# Altium PCB Sound_Sensor_PoE_v1.0.PcbDoc (part 1 of 4)
Units mil, origin at the board's own origin, x right, y up, seen from the top; angles counter-clockwise.
Board outline 3543.31 x 3543.31 mil, 2 copper layers (Top Layer, Bottom Layer), stack 57 mil thick; 149 components, 113 nets, 536 pads, 184 vias.
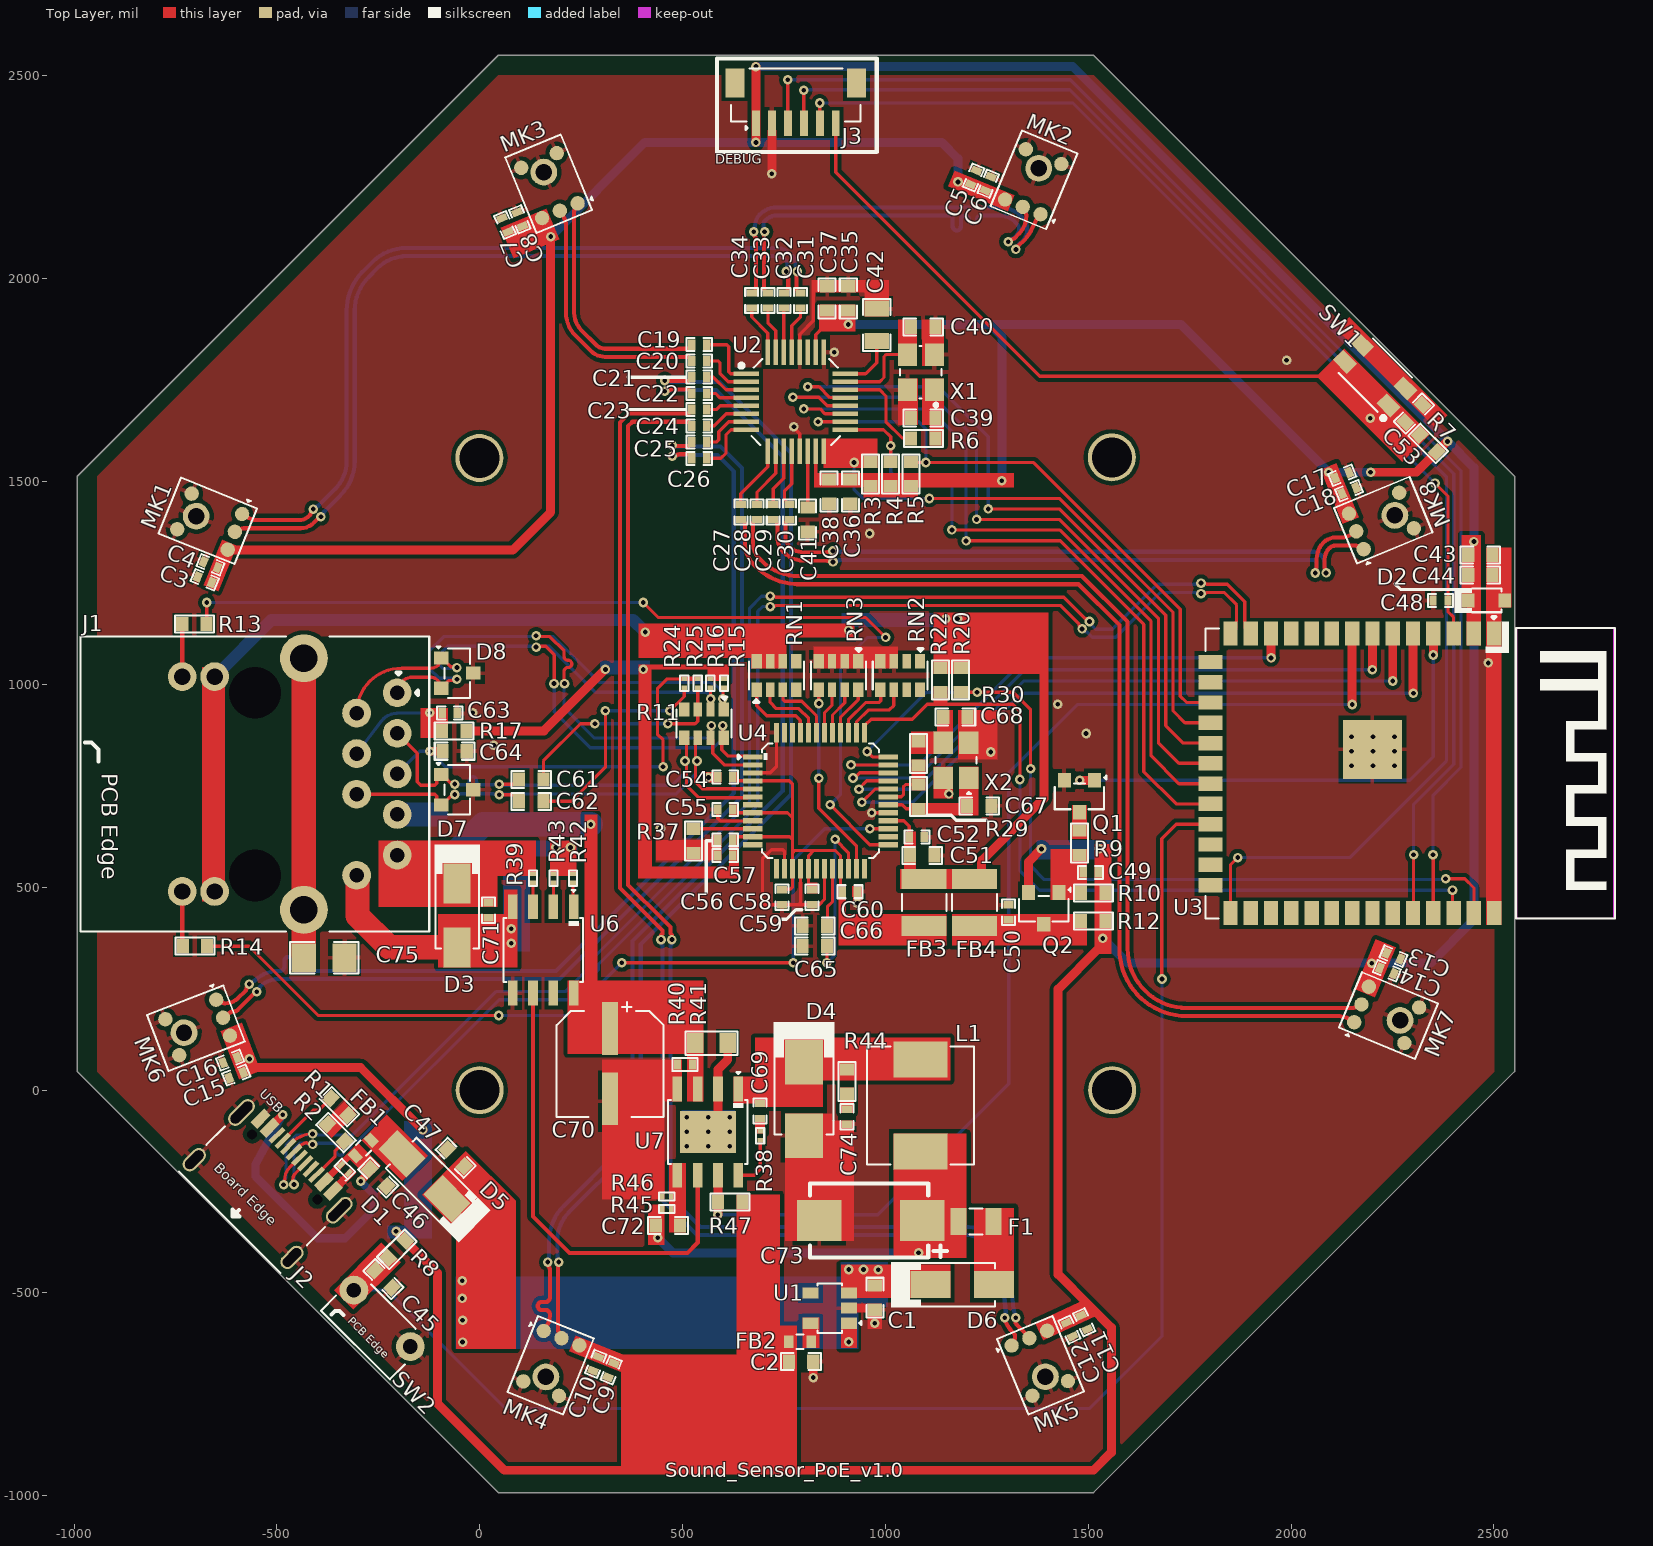
[diagram p0: Top Layer view]
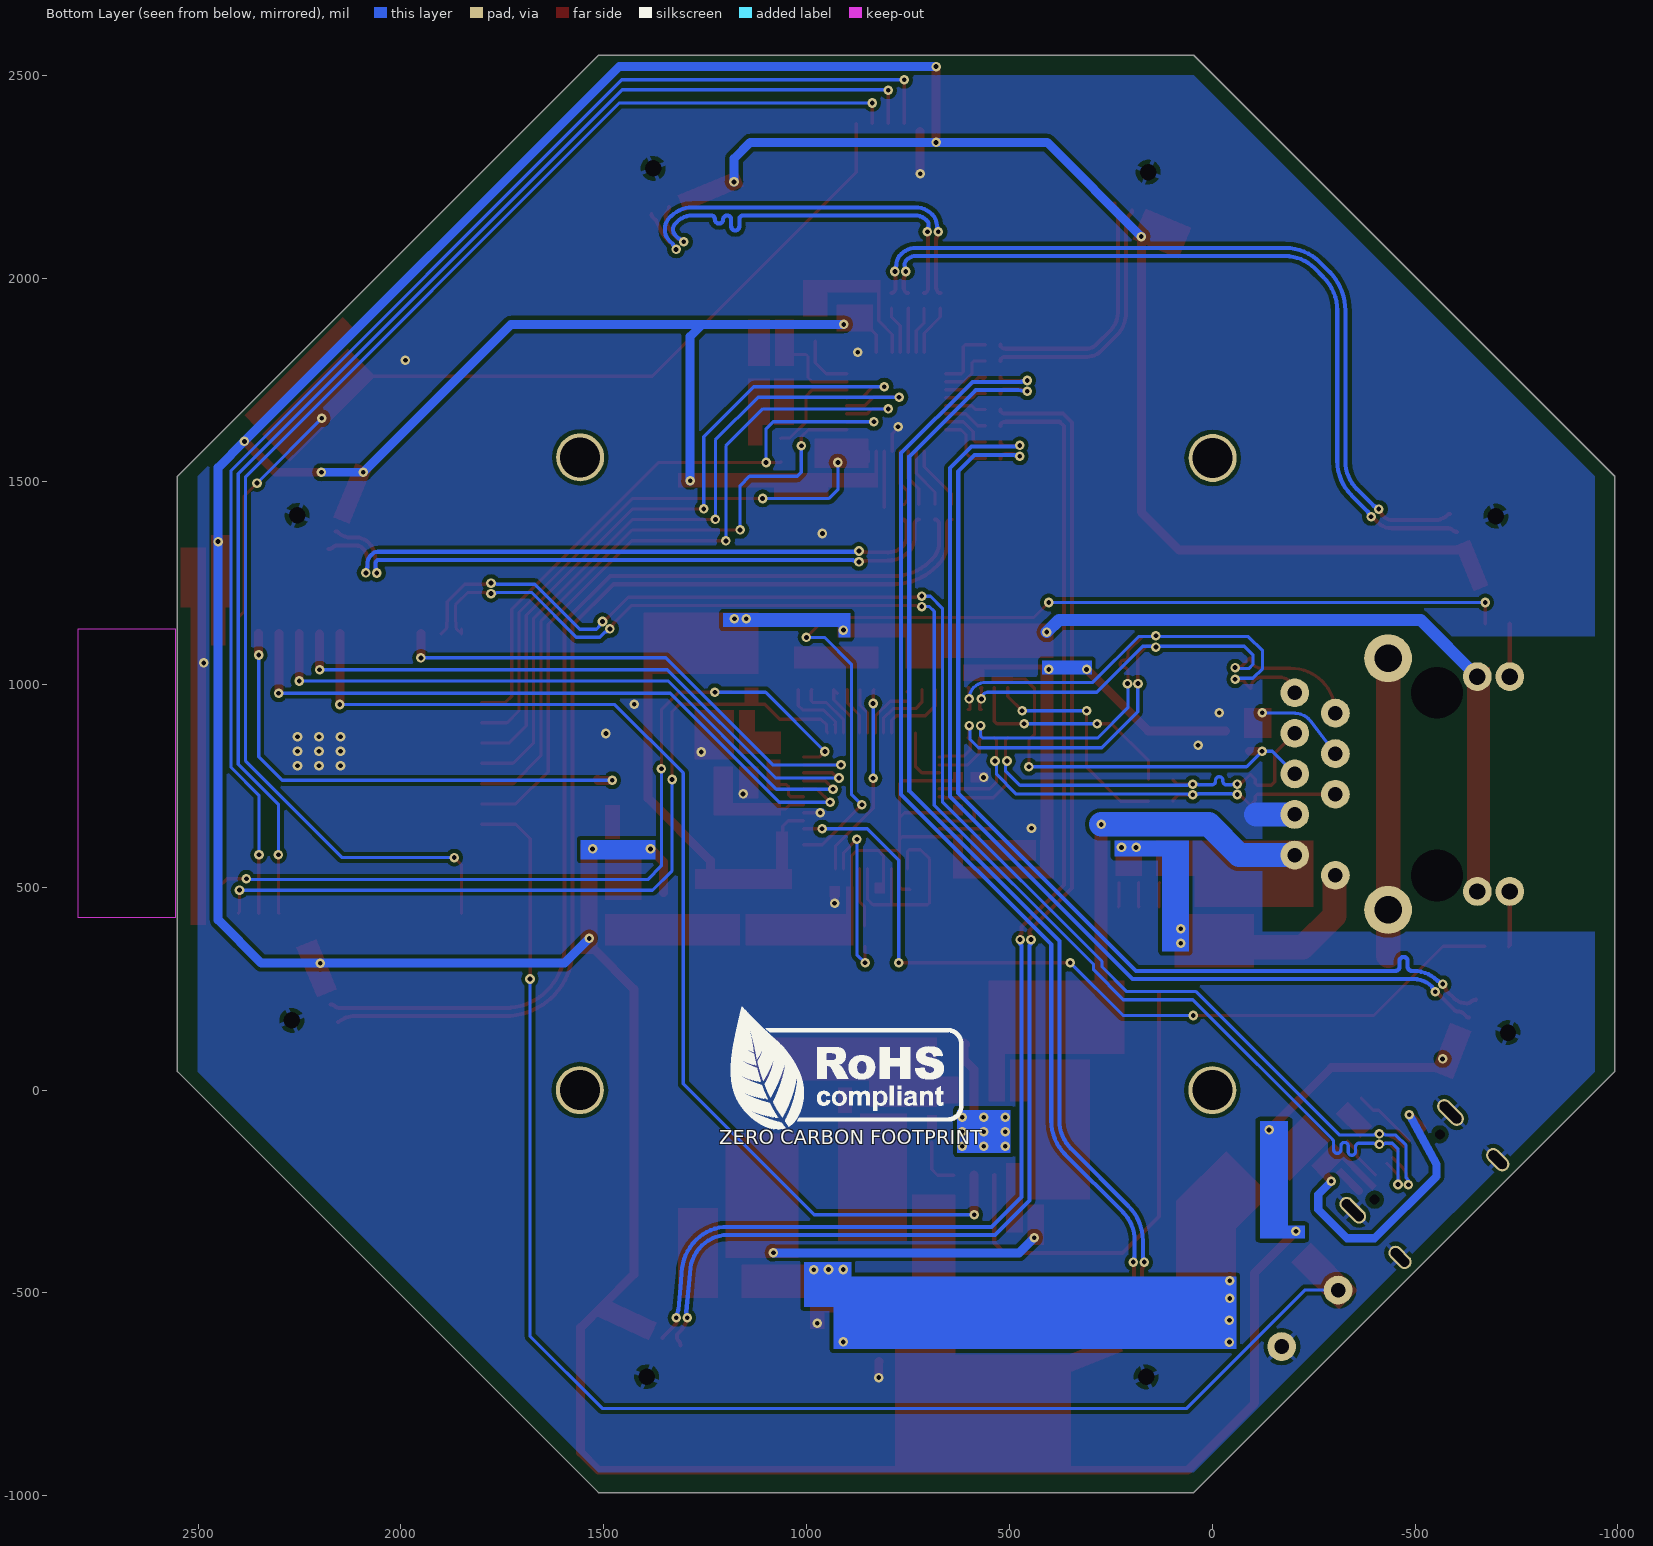
[diagram p1: Bottom Layer view, seen from below]
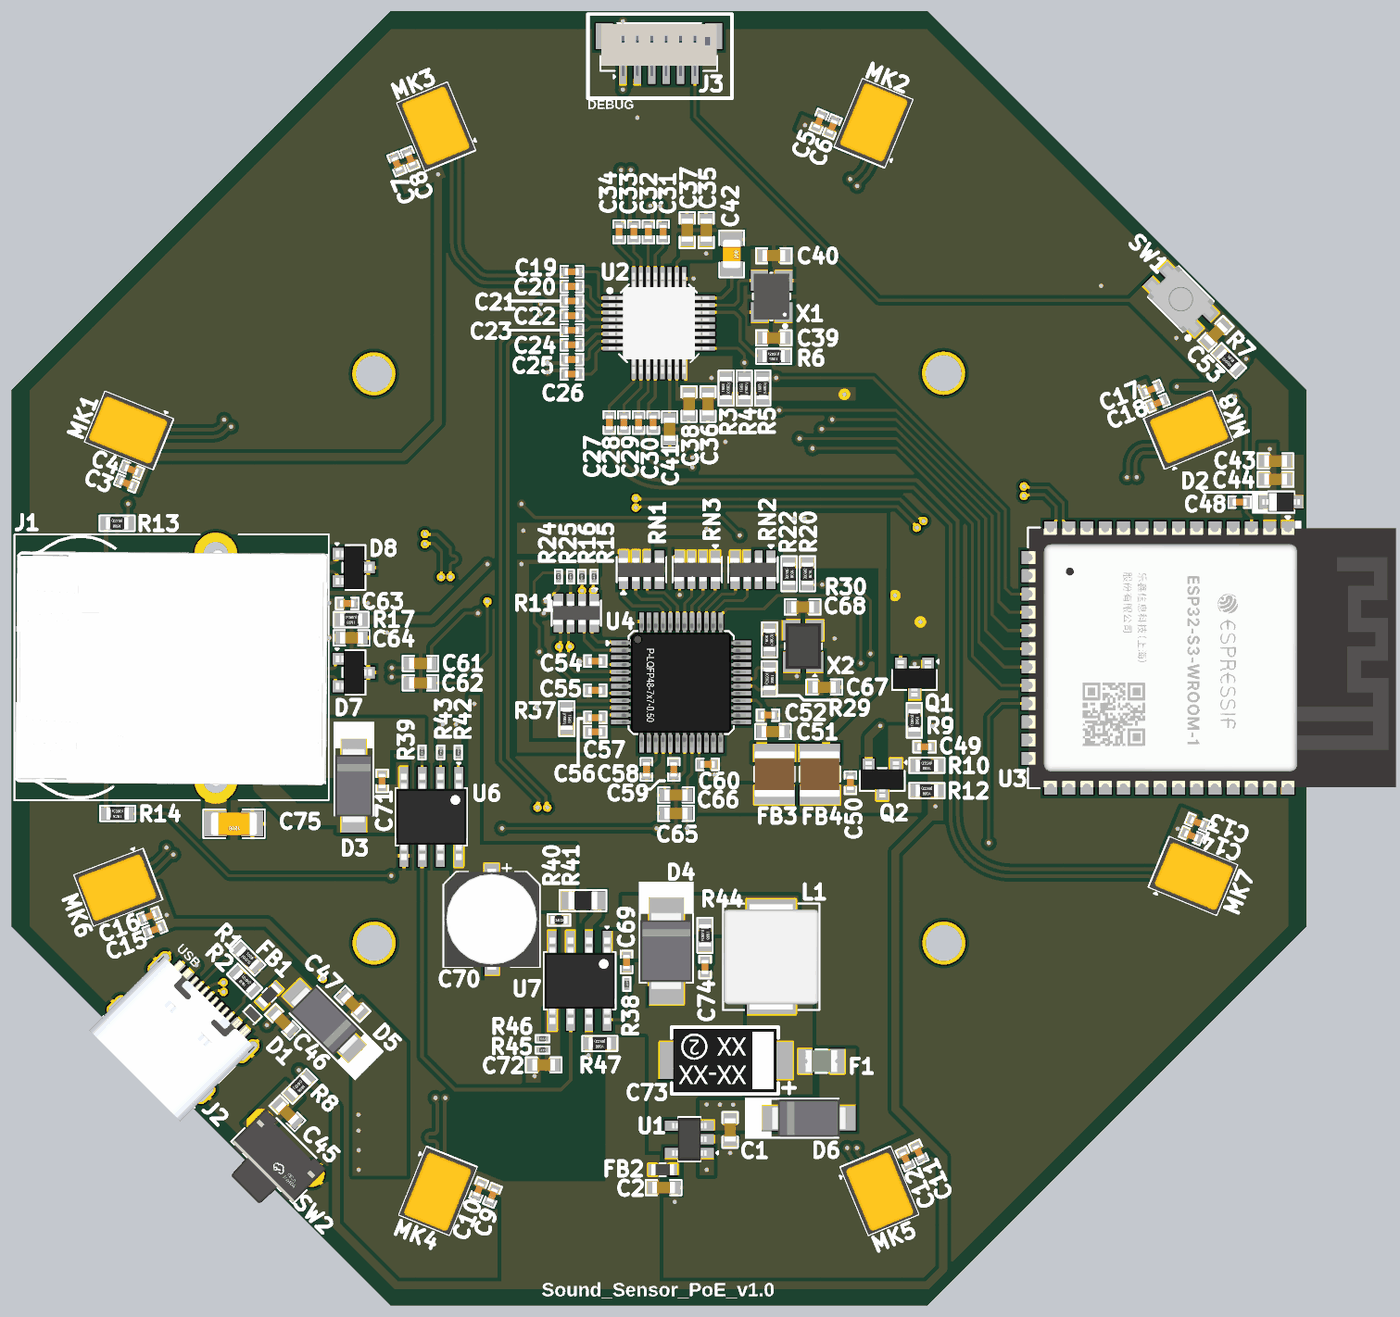
[diagram p3: 3D render of the assembled board from above, using the file's embedded part models]

## Layer stack, top to bottom
Top Solder: solder mask 3, Solder Resist, Dk 3.5
Top Layer: signal copper 10
Dielectric 1: dielectric 37, FR-4, Dk 4.8
Bottom Layer: signal copper 10
Bottom Solder: solder mask 3, Solder Resist, Dk 3.5

## Board outline
-992.17,45.64 45.64,-992.17 1513.33,-992.17 2551.14,45.64 2551.14,1513.33 1513.33,2551.14 45.64,2551.14 -992.17,1513.33

## Design rules (kind name [scope] priority, off if disabled: settings)
Clearance Clearance_top [OnLayer('Top Layer')] p1: gap=10 ignorepadtopadclearanceinfootprint=FALSE except(5: SMDPad-THPad SMDPad-Hole; 7: Arc-SMDPad Track-SMDPad SMDPad-SMDPad)
Clearance Clearance_Bottom [OnLayer('Bottom Layer')] p2: gap=10 ignorepadtopadclearanceinfootprint=FALSE except(5: SMDPad-THPad SMDPad-Hole; 7: Arc-SMDPad Track-SMDPad SMDPad-SMDPad)
ComponentClearance [All] p1: gap=0 collisioncheckmode=3 verticalgap=0 showdistances=FALSE
DiffPairsRouting DiffPairsRouting_10 [InDifferentialPairClass('USB_Lines')] p1: maxlimit=12 minlimit=10 mostfreqgap=12 toplayer_minwidth=8 toplayer_maxwidth=8 toplayer_prefwidth=8 bottomlayer_minwidth=8 bottomlayer_maxwidth=8 bottomlayer_prefwidth=8 impedanceprofiledriven=TRUE impedanceprofileid={CC3068ED-7670-4747-8044-4FC642AA30B4} impedanceprofilevalue=90.000000 maxuncoupledlength=500
DiffPairsRouting DiffPairsRouting_2 [InDifferentialPairClass('OUT8_Lines')] p2: maxlimit=10 minlimit=10 mostfreqgap=10 toplayer_minwidth=10 toplayer_maxwidth=10 toplayer_prefwidth=10 bottomlayer_minwidth=10 bottomlayer_maxwidth=10 bottomlayer_prefwidth=10 impedanceprofiledriven=TRUE impedanceprofileid={4D369393-52E4-4E5C-B60A-CF207B47102A} impedanceprofilevalue=80.000000 maxuncoupledlength=500
DiffPairsRouting DiffPairsRouting_9 [InDifferentialPairClass('OUT7_Lines')] p3: maxlimit=10 minlimit=10 mostfreqgap=10 toplayer_minwidth=10 toplayer_maxwidth=10 toplayer_prefwidth=10 bottomlayer_minwidth=10 bottomlayer_maxwidth=10 bottomlayer_prefwidth=10 impedanceprofiledriven=TRUE impedanceprofileid={4D369393-52E4-4E5C-B60A-CF207B47102A} impedanceprofilevalue=80.000000 maxuncoupledlength=500
DiffPairsRouting DiffPairsRouting_8 [InDifferentialPairClass('OUT6_Lines')] p4: maxlimit=10 minlimit=10 mostfreqgap=10 toplayer_minwidth=10 toplayer_maxwidth=10 toplayer_prefwidth=10 bottomlayer_minwidth=10 bottomlayer_maxwidth=10 bottomlayer_prefwidth=10 impedanceprofiledriven=TRUE impedanceprofileid={4D369393-52E4-4E5C-B60A-CF207B47102A} impedanceprofilevalue=80.000000 maxuncoupledlength=500
DiffPairsRouting DiffPairsRouting_7 [InDifferentialPairClass('OUT5_Lines')] p5: maxlimit=10 minlimit=10 mostfreqgap=10 toplayer_minwidth=10 toplayer_maxwidth=10 toplayer_prefwidth=10 bottomlayer_minwidth=10 bottomlayer_maxwidth=10 bottomlayer_prefwidth=10 impedanceprofiledriven=TRUE impedanceprofileid={4D369393-52E4-4E5C-B60A-CF207B47102A} impedanceprofilevalue=80.000000 maxuncoupledlength=500
DiffPairsRouting DiffPairsRouting_6 [InDifferentialPairClass('OUT4_Lines')] p6: maxlimit=10 minlimit=10 mostfreqgap=10 toplayer_minwidth=10 toplayer_maxwidth=10 toplayer_prefwidth=10 bottomlayer_minwidth=10 bottomlayer_maxwidth=10 bottomlayer_prefwidth=10 impedanceprofiledriven=TRUE impedanceprofileid={4D369393-52E4-4E5C-B60A-CF207B47102A} impedanceprofilevalue=80.000000 maxuncoupledlength=500
DiffPairsRouting DiffPairsRouting_5 [InDifferentialPairClass('OUT3_Lines')] p7: maxlimit=10 minlimit=10 mostfreqgap=10 toplayer_minwidth=10 toplayer_maxwidth=10 toplayer_prefwidth=10 bottomlayer_minwidth=10 bottomlayer_maxwidth=10 bottomlayer_prefwidth=10 impedanceprofiledriven=TRUE impedanceprofileid={4D369393-52E4-4E5C-B60A-CF207B47102A} impedanceprofilevalue=80.000000 maxuncoupledlength=500
DiffPairsRouting DiffPairsRouting_4 [InDifferentialPairClass('OUT2_Lines')] p8: maxlimit=10 minlimit=10 mostfreqgap=10 toplayer_minwidth=10 toplayer_maxwidth=10 toplayer_prefwidth=10 bottomlayer_minwidth=10 bottomlayer_maxwidth=10 bottomlayer_prefwidth=10 impedanceprofiledriven=TRUE impedanceprofileid={4D369393-52E4-4E5C-B60A-CF207B47102A} impedanceprofilevalue=80.000000 maxuncoupledlength=500
DiffPairsRouting DiffPairsRouting_3 [InDifferentialPairClass('OUT1_Lines')] p9: maxlimit=10 minlimit=10 mostfreqgap=10 toplayer_minwidth=10 toplayer_maxwidth=10 toplayer_prefwidth=10 bottomlayer_minwidth=10 bottomlayer_maxwidth=10 bottomlayer_prefwidth=10 impedanceprofiledriven=TRUE impedanceprofileid={4D369393-52E4-4E5C-B60A-CF207B47102A} impedanceprofilevalue=80.000000 maxuncoupledlength=500
DiffPairsRouting DiffPairsRouting_1 [InDifferentialPairClass('Ethernet_Lines')] p10: maxlimit=16 minlimit=10 mostfreqgap=16 toplayer_minwidth=8 toplayer_maxwidth=8 toplayer_prefwidth=8 bottomlayer_minwidth=8 bottomlayer_maxwidth=8 bottomlayer_prefwidth=8 impedanceprofiledriven=TRUE impedanceprofileid={FC305CDD-E4C1-4513-972F-A62FC3777315} impedanceprofilevalue=100.000000 maxuncoupledlength=551
DiffPairsRouting [InDifferentialPairClass('EtherCAT_A_Lines')] p11: maxlimit=16 minlimit=16 mostfreqgap=16 toplayer_minwidth=8 toplayer_maxwidth=8 toplayer_prefwidth=8 bottomlayer_minwidth=8 bottomlayer_maxwidth=8 bottomlayer_prefwidth=8 impedanceprofiledriven=TRUE impedanceprofileid={FC305CDD-E4C1-4513-972F-A62FC3777315} impedanceprofilevalue=100.000000 maxuncoupledlength=500
HoleSize [All] p1: absolutevalues=TRUE maxlimit=500 minlimit=1 maxpercent=80.000 minpercent=20.000
MatchedLengths "Schematic Matched Net Lengths_4" [InDifferentialPairClass('EtherCAT_A_Lines')] p1: tolerance=20 checknetsindiffpair=TRUE checkdiffpairvsdiffpair=FALSE checkxsignals=FALSE checkothers=FALSE
MatchedLengths "Schematic Matched Net Lengths_3" [InDifferentialPairClass('EtherCAT_A_Lines')] p2: tolerance=20 checknetsindiffpair=TRUE checkdiffpairvsdiffpair=FALSE checkxsignals=FALSE checkothers=FALSE
MatchedLengths "Schematic Matched Net Lengths_2" [InNetClass('USB')] p3: tolerance=20 checknetsindiffpair=TRUE checkdiffpairvsdiffpair=FALSE checkxsignals=FALSE checkothers=FALSE
MatchedLengths "Schematic Matched Net Lengths_1" [InNetClass('Ethernet')] p4: tolerance=20 checknetsindiffpair=TRUE checkdiffpairvsdiffpair=FALSE checkxsignals=FALSE checkothers=FALSE
MatchedLengths "Schematic Matched Net Lengths" [InNetClass('OUT1')] p5: tolerance=20 checknetsindiffpair=TRUE checkdiffpairvsdiffpair=FALSE checkxsignals=FALSE checkothers=FALSE
MaxMinImpedance "Schematic Impedance Constraint_3" [InNetClass('Ethernet')] p1: minimum=97.00 maximum=105.0
MaxMinImpedance "Schematic Impedance Constraint_1" [InNetClass('EtherCAT_A')] p2: minimum=85.00 maximum=95.00
MaxMinImpedance "Schematic Impedance Constraint_2" [InNetClass('USB')] p3: minimum=85.00 maximum=95.00
MaxMinImpedance "Schematic Impedance Constraint" [InNetClass('OUT1')] p4: minimum=85.00 maximum=95.00
MinimumSolderMaskSliver [All] p1: minsoldermaskwidth=0
PolygonConnect [All] p1: thpad.connectstyle=Relief thpad.reliefconductorwidth=10 thpad.reliefentries=4 thpad.polygonreliefangle="90 Angle" thpad.airgapwidth=10 smdpad.connectstyle=Relief smdpad.reliefconductorwidth=10 smdpad.reliefentries=4 smdpad.polygonreliefangle="90 Angle" smdpad.airgapwidth=10 via.connectstyle=Direct via.reliefconductorwidth=10 via.reliefentries=4 via.polygonreliefangle="90 Angle" via.airgapwidth=10
RoutingVias [All] p1: holewidth=11.81 width=23.62 viastyle="Through Hole" minholewidth=11.81 minwidth=23.62 maxholewidth=11.81 maxwidth=23.62
SilkToSilkClearance [All] p1: silktosilkclearance=0
SilkToSolderMaskClearance [IsPad] p1: minsilkscreentomaskgap=0 clearancetoexposedcopper=TRUE
SolderMaskExpansion [All] p1: expansion=4 istentingtop=FALSE
Width [All] p1: maxlimit=100 minlimit=8 preferedwidth=22 toplayer_maxwidth=60 minimp=50.000000 maximp=50.000000 favimp=50.000000
24 further rules are at their usual default settings.

## Classes and differential pairs
differential pair class Ethernet_Lines: RD TD
differential pair class EtherCAT_A_Lines: RD TD
net class Ethernet: RD_P TD_N TD_P
net class EtherCAT_A: RD_N RD_P TD_N TD_P
component class U_Ethernet_POE: C49 C50 C51 C52 C54 C55 C56 C57 C58 C59 C60 C61 C62 C63 C64 C65 C66 C67 C68 C69 C70 C71 C72 C73 C74 C75 D3 D4 D6 D7 D8 F1 FB3 FB4 J1 L1 Q1 Q2 R9 R10 R11 R12 R13 R14 R15 R16 R17 R20 R22 R24 R25 R29 R30 R37 R38 R39 R40 R41 R42 R43 R44 R45 R46 R47 RN1 RN2 RN3 S U4 U6 U7 X2
differential pair class USB_Lines: USB.USB
net class USB: USB.USB_N USB.USB_P
differential pair class OUT8_Lines: MIC_OUTS.OUT8
differential pair class OUT7_Lines: MIC_OUTS.OUT7
differential pair class OUT6_Lines: MIC_OUTS.OUT6
differential pair class OUT5_Lines: MIC_OUTS.OUT5
differential pair class OUT4_Lines: MIC_OUTS.OUT4
differential pair class OUT3_Lines: MIC_OUTS.OUT3
differential pair class OUT2_Lines: MIC_OUTS.OUT2
differential pair class OUT1_Lines: MIC_OUTS.OUT1
net class OUT8: MIC_OUTS.OUT8_N MIC_OUTS.OUT8_P
net class OUT7: MIC_OUTS.OUT7_N MIC_OUTS.OUT7_P
net class OUT6: MIC_OUTS.OUT6_N MIC_OUTS.OUT6_P
net class OUT5: MIC_OUTS.OUT5_N MIC_OUTS.OUT5_P
net class OUT4: MIC_OUTS.OUT4_N MIC_OUTS.OUT4_P
net class OUT3: MIC_OUTS.OUT3_N MIC_OUTS.OUT3_P
net class OUT2: MIC_OUTS.OUT2_N MIC_OUTS.OUT2_P
net class OUT1: MIC_OUTS.OUT1_N MIC_OUTS.OUT1_P
component class U_Sensor_Sheet: C3 C4 C5 C6 C7 C8 C9 C10 C11 C12 C13 C14 C15 C16 C17 C18 MK1 MK2 MK3 MK4 MK5 MK6 MK7 MK8
component class U_Power_Section: C1 C2 FB2 U1
component class U_Controller_Sheet: C43 C44 C45 C48 C53 D2 R7 R8 SW1 SW2 U3
component class U_Connector_Sheet: C46 C47 D1 D5 FB1 J2 J3 R1 R2
component class U_ADC_Section: 3 C19 C20 C21 C22 C23 C24 C25 C26 C27 C28 C29 C30 C31 C32 C33 C34 C35 C36 C37 C38 C39 c40 C41 C42 R3 R4 R5 R6 U2 X1
differential pair TD: +TD_P -TD_N
differential pair RD: +RD_P -RD_N
differential pair USB.USB: +USB.USB_P -USB.USB_N
differential pair MIC_OUTS.OUT8: +MIC_OUTS.OUT8_P -MIC_OUTS.OUT8_N
differential pair MIC_OUTS.OUT7: +MIC_OUTS.OUT7_P -MIC_OUTS.OUT7_N
differential pair MIC_OUTS.OUT6: +MIC_OUTS.OUT6_P -MIC_OUTS.OUT6_N
differential pair MIC_OUTS.OUT5: +MIC_OUTS.OUT5_P -MIC_OUTS.OUT5_N
differential pair MIC_OUTS.OUT4: +MIC_OUTS.OUT4_P -MIC_OUTS.OUT4_N
differential pair MIC_OUTS.OUT3: +MIC_OUTS.OUT3_P -MIC_OUTS.OUT3_N
differential pair MIC_OUTS.OUT2: +MIC_OUTS.OUT2_P -MIC_OUTS.OUT2_N
differential pair MIC_OUTS.OUT1: +MIC_OUTS.OUT1_P -MIC_OUTS.OUT1_N

## Components (designator, comment, footprint, x,y, rotation, side; value= is the part's Value field where it differs from the comment)
C1 "1uF" Cap-0603 974.06,-511.51 r270 top locked
C2 "4.7uF" Cap-0603 792.06,-669.39 r0 top locked
C3 "1uF" Cap-0402 -677.67,1258.42 r158 top locked
C4 "220pF" "Cap 0402" -663.51,1295.49 r158 top locked
C5 "1uF" Cap-0402 1217.34,2249.59 r67.5 top locked
C6 "220pF" "Cap 0402" 1253.49,2234.49 r67.5 top locked
C7 "1uF" Cap-0402 62.41,2132.58 r112.5 top locked
C8 "220pF" "Cap 0402" 98.71,2146.52 r112.5 top locked
C9 "1uF" Cap-0402 323.81,-690.46 r248 top
C10 "220pF" "Cap 0402" 286.35,-674.64 r248 top
C11 "1uF" Cap-0402 1489.87,-572.39 r295 top
C12 "220pF" "Cap 0402" 1453.87,-590.39 r295 top
C13 "1uF" Cap-0402 2252.49,330.49 r337.5 top
C14 "220pF" "Cap 0402" 2236.25,294 r337.5 top
C15 "1uF" Cap-0402 -600,37 r201 top
C16 "220pF" "Cap 0402" -615.07,74.11 r201 top
C17 "1uF" Cap-0402 2126.01,1515.49 r22.5 top locked
C18 "220pF" "Cap 0402" 2143.1,1477.77 r22.5 top locked
C19 "100nF" Cap-0402 541.09,1837.49 r0 top locked
C20 "100nF" Cap-0402 541.09,1797.49 r0 top locked
C21 "100nF" Cap-0402 541.09,1757.49 r0 top locked
C22 "100nF" Cap-0402 541.09,1717.49 r0 top locked
C23 "100nF" Cap-0402 541.09,1677.49 r0 top locked
C24 "100nF" Cap-0402 541.09,1637.49 r0 top locked
C25 "100nF" Cap-0402 541.09,1597.49 r0 top locked
C26 "100nF" Cap-0402 541.09,1557.49 r0 top locked
C27 "100nF" Cap-0402 643.59,1424.99 r90 top locked
C28 "100nF" Cap-0402 683.59,1424.99 r90 top locked
C29 "100nF" Cap-0402 723.59,1424.99 r90 top locked
C30 "100nF" Cap-0402 763.59,1424.99 r90 top locked
C31 "100nF" Cap-0402 790.59,1946.49 r270 top locked
C32 "100nF" Cap-0402 750.59,1946.49 r270 top locked
C33 "100nF" Cap-0402 710.59,1946.49 r270 top locked
C34 "100nF" Cap-0402 670.59,1946.49 r270 top locked
C35 "1uF" Cap-0603 908.59,1951.49 r90 top locked
C36 "1uF" Cap-0603 913.59,1475.49 r270 top
C37 "100nF" Cap-0603 856.59,1951.49 r90 top
C38 "100nF" Cap-0603 861.59,1475.49 r270 top
C39 "20pF" Cap-0603 1093.59,1656.49 r0 top locked
C40 "20pF" Cap-0603 1093.59,1881.49 r180 top locked
C41 "100nF" Cap-0603 808.59,1406.49 r270 top locked
C42 "220nF" Cap-0805 978.59,1886.49 r270 top locked
C43 "1uF" Cap-0603 2466.6,1319.56 r0 top
C44 "100nF" Cap-0603 2466.6,1269.56 r0 top
C45 "100nF" Cap-0603 -237.3,-465.73 r135 top locked
C46 "1uF" Cap-0603 -250.26,-215.36 r315 top
C47 "1uF" Cap-0603 -59.23,-166.74 r135 top
C48 "1uF" Cap-0402 2368.42,1206.99 r0 top
C49 "22nF" Cap-0402 1506,537 r0 top
C50 "22nF" Cap-0402 1303.49,438.49 r270 top
C51 "10uF" Cap-0603 1091.11,578.86 r180 top
C52 "0.1uf" Cap-0402 1077.61,623.9 r180 top locked
C53 "100nF" Cap-0603 2303,1667.98 r45 top locked
C54 "0.1uf" Cap-0402 605.19,771.68 r0 top
C55 "0.1uf" Cap-0402 605.19,691.64 r0 top
C56 "0.1uf" Cap-0402 605.19,617.15 r0 top locked
C57 "0.1uf" Cap-0402 605.19,578.15 r0 top locked
C58 "0.1uf" Cap-0402 745.27,475.34 r90 top
C59 "0.1uf" Cap-0402 819.63,475.34 r90 top
C60 "0.1uf" Cap-0402 912.5,489 r180 top
C61 "6.8nF" Cap-0603 127,765.5 r0 top
C62 "6.8nF" Cap-0603 127,711.96 r0 top
C63 "22nF" Cap-0402 -73.83,929.49 r180 top
C64 "10nF" Cap-0603 -61.77,835.38 r180 top
C65 "10nF" Cap-0603 826,355 r0 top
C66 "4.7uF" Cap-0603 826,405 r0 top
C67 "12pF" Cap-0603 1231.49,700.49 r180 top locked
C68 "12pF" Cap-0603 1172.57,919.71 r180 top locked
C69 "0.1uf" Cap-0402 690.69,-51.6 r270 top locked
C70 "15uF" VMMC0571J150MV 321.49,65.1 r270 top
C71 "0.1uf" Cap-0402 22,443.5 r90 top
C72 "12pF" Cap-0603 463.99,-333.8 r180 top locked
C73 "470uF" Case-E 1090.49,-321.51 r180 top locked
C74 "220pF" "Cap 0402" 905.52,-65.51 r90 top
C75 "1000pF" Cap-1206 -383.26,326.49 r180 top
D1 "TPD1E10B06DPYR" X1SON -332.42,-194.48 r135 top
D2 "UDD32C03L01" SOD-323 2481.6,1206.99 r0 top
D3 "SMAJ58A" SMA -55.51,430.75 r270 top locked
D4 "SS510B" SMB_ 799.52,-22.08 r90 top locked
D5 "SS36" SMA -136.12,-212.34 r135 top
D6 "SS36" SMA 1189.49,-479.51 r0 top locked
D7 "SP0502BAHTG" SOT-23 -55.51,740.49 r270 top
D8 "SP0502BAHTG" SOT-23 -55.51,1027.92 r270 top locked
F1 "BSMD0805L-200" Fuse-0805 1223.79,-323.51 r0 top
FB1 "BLM18SG121TN1D" "IND-0603 (1608 Metric)" -287.06,-142.7 r45 top locked
FB2 "BLM18SG121TN1D" "IND-0603 (1608 Metric)" 789.62,-620.51 r180 top locked
FB3 "FBMH3225HM601NT" IND-1210 1219.49,462.57 r90 top
FB4 "FBMH3225HM601NT" IND-1210 1095.61,462.57 r270 top
J1 "HR873170C" HR873170C -553.34,979.49 r90 top locked
J2 "TYPE-C-31-M-12" TYPE-C-31-M-12_ -539.96,-70.6 r315 top locked
J3 "Voltlink Target" "Voltlink Target" 779.28,2432.7 r0 top locked
L1 "33uH" MDA7050_330M 1086.44,-37.59 r270 top locked
MK1 "SPM0687LR5H-1" SPM0687LR5H-1 -665.59,1401.32 r248 top locked
MK2 "SPM0687LR5H-1" SPM0687LR5H-1 1364.42,2239.08 r157.5 top locked
MK3 "SPM0687LR5H-1" SPM0687LR5H-1 171.94,2229.68 r202.5 top locked
MK4 "SPM0687LR5H-1" SPM0687LR5H-1 176.65,-673.59 r338 top locked
MK5 "SPM0687LR5H-1" SPM0687LR5H-1 1380.66,-673.32 r22.5 top locked
MK6 "SPM0687LR5H-1" SPM0687LR5H-1 -695.15,154.53 r291 top locked
MK7 "SPM0687LR5H-1" SPM0687LR5H-1 2235.6,185.55 r67.5 top locked
MK8 "SPM0687LR5H-1" SPM0687LR5H-1 2222.73,1403.02 r112.5 top locked
Q1 "LMUN2211LT1G" SOT-23 1478.5,724.36 r180 top
Q2 "AO3407" SOT-23 1390.49,447.99 r180 top
R1 "5.1K" Res-0603 -345.85,-40.75 r135 top locked
R2 "5.1K" Res-0603 -354.2,-104.78 r315 top locked
R3 "100K" RES-0603 963,1519 r270 top locked
R4 "100K" RES-0603 1013,1519 r270 top locked
R5 "100K" RES-0603 1063,1519 r270 top locked
R6 "0R" Res-0603 1093.59,1606.49 r0 top locked
R7 "10K" Res-0603 2338.01,1594.27 r135 top locked
R8 "10K" Res-0603 -204.3,-392.3 r45 top locked
R9 "1K" Res-0603 1478.5,609.6 r90 top
R10 "10K" Res-0603 1512.49,486.36 r0 top
R11 "33R" YC164-JR-0733RL 601.99,938.17 r270 top locked
R12 "0R" Res-0603 1512.49,417 r0 top
R13 "330R" Res-0603 -703.26,1149 r0 top
R14 "330R" Res-0603 -701.89,354.86 r0 top
R15 "49.9R" Res-0201 601.94,1002.88 r90 top
R16 "49.9R" Res-0201 568.29,1002.88 r90 top
R17 "10R" Res-0603 -62.77,885.33 r0 top
R20 "10K" Res-0603 1185.69,1010.93 r90 top locked
R22 "10K" Res-0603 1135.69,1010.93 r90 top locked
R24 "49.9R" Res-0201 504.35,1002.88 r270 top
R25 "49.9R" Res-0201 537.42,1002.88 r270 top
R29 "1M" Res-0603 1081.33,723.38 r90 top locked
R30 "0R" Res-0603 1081.92,830.06 r270 top locked
R37 "12.4K" Res-0603 526.99,614.27 r90 top
R38 "4.7R" Res-0201 691.49,-112.38 r270 top
R39 "24.9K" Res-0201 131.2,522 r90 top value=24.9kR
R40 "4.7K" Res-0402 506.02,63.02 r0 top
R41 "30mR" RES-0805 571.52,116.02 r180 top locked
R42 "180K" Res-0201 230.2,522 r270 top value=180kR
R43 "4.42k" Res-0201 182.2,522 r270 top
R44 "DNP" Res-0603 905.52,21.02 r90 top locked
R45 "300K" Res-0201 460.98,-292.78 r180 top locked value=300kR
R46 "57.6k" Res-0201 460.98,-261.98 r0 top locked value=57.6kR
R47 "10K" Res-0603 617.52,-275.28 r0 top locked
RN1 "10K" YC164-FR-0710KL 682.85,987.35 r90 top locked value=10kR
RN2 "10K" YC164-FR-0710KL 1085.33,1056.84 r270 top locked value=10kR
RN3 "10K" YC164-FR-0710KL 933,1056.84 r270 top locked value=10kR
SW1 "TS-1185EC-C-D-B" TS-1185EC-C-D-B 2207.49,1762.49 r135 top locked
SW2 "K2-1101DF-C4DW-01" K2-1101DF-C4DW-01 -240.51,-562.51 r315 top locked
U1 "XC6220B331MR-G" SOT-25-5 862.62,-537.13 r180 top locked
U2 "ADS131M08IPBSR" 32TQFP 779.14,1696.8 r0 top locked
U3 "ESP32-S3-WROOM-1-N8R2" "41-SMD Module" 2151.09,780.68 r270 top locked
U4 "W5500" "48-LQFP (7x7)_" 840.16,713.16 r0 top locked
U6 "TPS2375DR" SOIC-8 156.49,345.49 r270 top locked
U7 "TX4138" 8-SOIC-EP 562.52,-103.28 r270 top locked
X1 "3TJ481920NYLBC" 3TJ481920NYLBC 1087.65,1769.79 r90 top locked
X2 "25MHZ" NX3225GA-25MHZ-STD-CRG-2 1174.07,812.74 r90 top locked

## Footprints (in the part's own frame and the unit in brackets; to place one, negate y for a bottom-side part, rotate by r counter-clockwise, add the part's x,y. Pads: shape width x height; smd on the part's side, far side on the other; paste and mask are expansions set on the pad)
3TJ481920NYLBC [mm]
  rect 1.4x1.2 smd mask+0.07: 1(-1.1,-0.85) 2(1.1,-0.85) 3(1.1,0.85) 4(-1.1,0.85)
  silkscreen extent -2.14,-1.3 1.65,1.3, body extent -1.6,-1.25 1.6,1.25, height 0.91
8-SOIC-EP [mm]
  rect 1.55x0.6 smd: 1(-2.7,1.905) 2(-2.7,0.635) 3(-2.7,-0.635) 4(-2.7,-1.905) 5(2.7,-1.905) 6(2.7,-0.635) 7(2.7,0.635) 8(2.7,1.905)
  rect 2.613x3.502 smd: 9(0,0)
  silkscreen extent -3.76,-2.49 1.99,2.49, body extent -3,-2.45 3,2.45, height 1.7
32TQFP [mm]
  rect 1.6x0.3 smd: 1(-3.1,1.75) 2(-3.1,1.25) 3(-3.1,0.75) 4(-3.1,0.25) 5(-3.1,-0.25) 6(-3.1,-0.75) 7(-3.1,-1.25) 8(-3.1,-1.75) 17(3.1,-1.75) 18(3.1,-1.25) 19(3.1,-0.75) 20(3.1,-0.25) 21(3.1,0.25) 22(3.1,0.75) 23(3.1,1.25) 24(3.1,1.75)
  rect 0.3x1.6 smd: 9(-1.75,-3.1) 10(-1.25,-3.1) 11(-0.75,-3.1) 12(-0.25,-3.1) 13(0.25,-3.1) 14(0.75,-3.1) 15(1.25,-3.1) 16(1.75,-3.1) 25(1.75,3.1) 26(1.25,3.1) 27(0.75,3.1) 28(0.25,3.1) 29(-0.25,3.1) 30(-0.75,3.1) 31(-1.25,3.1) 32(-1.75,3.1)
  silkscreen extent -3.53,-2.72 2.77,2.69, body extent -3.5,-3.51 3.5,3.49, height 1.25
"41-SMD Module" [mm]
  rect 1.5x0.9 smd: 1(-8.75,8.88) 2(-8.75,7.61) 3(-8.75,6.34) 4(-8.75,5.07) 5(-8.75,3.8) 6(-8.75,2.53) 7(-8.75,1.26) 8(-8.75,-0.01) 9(-8.75,-1.28) 10(-8.75,-2.55) 11(-8.75,-3.82) 12(-8.75,-5.09) 13(-8.75,-6.36) 14(-8.75,-7.63) 27(8.75,-7.63) 28(8.75,-6.36) 29(8.75,-5.09) 30(8.75,-3.82) 31(8.75,-2.55) 32(8.75,-1.28) 33(8.75,-0.01) 34(8.75,1.26) 35(8.75,2.53) 36(8.75,3.8) 37(8.75,5.07) 38(8.75,6.34) 39(8.75,7.61) 40(8.75,8.88)
  rect 0.9x1.5 smd: 15(-6.98,-8.88) 16(-5.71,-8.88) 17(-4.44,-8.88) 18(-3.17,-8.88) 19(-1.9,-8.88) 20(-0.63,-8.88) 21(0.64,-8.88) 22(1.91,-8.88) 23(3.18,-8.88) 24(4.45,-8.88) 25(5.72,-8.88) 26(6.99,-8.88)
  rect 3.7x3.7 smd: 41(-1.5,1.26)
  Keep-Out Layer region: -9.042,10.285 9.042,10.285 9.042,16.381 -9.042,16.381
  silkscreen extent -9.8,-9.2 9.09,16.43, body extent -9.01,-9.14 9.01,16.37, height 3.16
"48-LQFP (7x7)_" [mm]
  rect 1.22x0.32 smd: 1(-4.25,2.75) 2(-4.25,2.25) 3(-4.25,1.75) 4(-4.25,1.25) 5(-4.25,0.75) 6(-4.25,0.25) 7(-4.25,-0.25) 8(-4.25,-0.75) 9(-4.25,-1.25) 10(-4.25,-1.75) 11(-4.25,-2.25) 12(-4.25,-2.75) 25(4.25,-2.75) 26(4.25,-2.25) 27(4.25,-1.75) 28(4.25,-1.25) 29(4.25,-0.75) 30(4.25,-0.25) 31(4.25,0.25) 32(4.25,0.75) 33(4.25,1.25) 34(4.25,1.75) 35(4.25,2.25) 36(4.25,2.75)
  rect 0.32x1.22 smd: 13(-2.75,-4.25) 14(-2.25,-4.25) 15(-1.75,-4.25) 16(-1.25,-4.25) 17(-0.75,-4.25) 18(-0.25,-4.25) 19(0.25,-4.25) 20(0.75,-4.25) 21(1.25,-4.25) 22(1.75,-4.25) 23(2.25,-4.25) 24(2.75,-4.25) 37(2.75,4.25) 38(2.25,4.25) 39(1.75,4.25) 40(1.25,4.25) 41(0.75,4.25) 42(0.25,4.25) 43(-0.25,4.25) 44(-0.75,4.25) 45(-1.25,4.25) 46(-1.75,4.25) 47(-2.25,4.25) 48(-2.75,4.25)
  silkscreen extent -5.16,-3.58 3.66,3.58, body extent -4.51,-4.51 4.49,4.49, height 1.43
"Cap 0402" [mil]
  rect 18x25 smd mask+2.36: 1(-18.5,0) 2(18.5,0)
  silkscreen extent -31,-16 31,16, body extent -20,-10 20,10, height 19
Cap-0402 [mil]
  rect 18x25 smd mask+2.36: 1(-18.5,0) 2(18.5,0)
  silkscreen extent -31,-16 31,16, body extent -20,-10 20,10, height 19
Cap-0603 [mil]
  rect 30x35 smd mask+2.36: 1(-30,0) 2(30,0)
  silkscreen extent -49,-21 49,21, body extent -32,-16 31,16, height 34
Cap-0805 [mil] "SMD 0805"
  rect 40x60 smd mask+2.76: 1(-40,0) 2(40,0)
  silkscreen extent -64,-34 64,34, body extent -39,-25 39,25, height 30
Cap-1206 [mil] "SMD 1206"
  rect 60x70 smd: 1(-50,0) 2(50,0)
  silkscreen extent -84,-39 84,39, body extent -63,-31 63,32, height 39
Case-E [mm]
  rect 2.79x2.57 smd: 1(0,0) 2(6.44,0)
  silkscreen extent -1.56,-2.31 7.03,2.31, body extent -0.27,-2.21 6.92,2.21, height 2.88
Fuse-0805 [mm]
  rect 1x1.7 smd: 1(-1.1,0) 2(1.1,0)
  silkscreen extent -0.41,-0.81 0.41,0.81, body extent -1.1,-0.75 1.1,0.75, height 1.24
HR873170C [mm]
  round 1.8 hole 0.91: 1(0,-8.89) 2(-1.27,-6.35) 3(-2.54,-8.89) 4(-3.81,-6.35) 5(-5.08,-8.89) 6(-6.35,-6.35) 7(-7.62,-8.89) 9(-10.16,-8.89) 10(-11.43,-6.35)
  round 1.8 hole 1.02: 11(1.01,2.54) 12(1.01,4.57) 13(-12.44,2.54) 14(-12.44,4.57)
  round 0 hole 3.25 unplated: MH(-11.43,0) MH(0,0)
  round 3 hole 1.72: "Shield 1"(-13.59,-3.05) "Shield 2"(2.16,-3.05)
  silkscreen extent -14.96,-10.9 3.53,10.95, body extent -14.91,-10.85 3.5,10.9, height 15.56
"IND-0603 (1608 Metric)" [mm] "0.063\" L x 0.032\" W (1.60mm x 0.80mm)"
  rect 0.6x0.8 smd: 1(-0.7,0) 2(0.7,0)
  silkscreen extent -0.2,-0.46 0.23,0.46, body extent -0.8,-0.4 0.8,0.4, height 0.78
IND-1210 [mm]
  rect 1.27x2.81 smd: 1(-1.471,0) 2(1.471,0)
  silkscreen extent -0.52,-1.4 0.52,1.4, body extent -1.6,-1.4 1.6,1.4, height 2.5
K2-1101DF-C4DW-01 [mm]
  round 1.8 hole 0.92: 1(-2.5,0) 2(2.5,0)
  silkscreen extent -3.05,-2.36 3.05,1.02, body extent -3,-4.04 3,0.96, height 3.45
MDA7050_330M [mm]
  rect 2.25x3.4 smd: 1(-2.875,0) 2(2.875,0)
  silkscreen extent -3.7,-3.35 3.7,3.35, body extent -3.65,-3.3 3.65,3.3, height 4.5
NX3225GA-25MHZ-STD-CRG-2 [mm]
  rect 1.4x1.2 smd: 1(-1.1,-0.8) 2(1.1,-0.8) 3(1.1,0.8) 4(-1.1,0.8)
  silkscreen extent -2.09,-1.3 0.2,1.3, body extent -1.6,-1.26 1.6,1.24, height 0.8
Res-0201 [mm]
  rect 0.27x0.37 smd mask+0.055: 1(-0.275,0) 2(0.275,0)
  silkscreen extent -0.48,-0.25 0.48,0.25, body extent -0.3,-0.15 0.3,0.15, height 0.29
Res-0402 [mil]
  rect 18x25 smd mask+2.17: 1(-18.5,0) 2(18.5,0)
  silkscreen extent -32,-17 32,16, body extent -23,-11 23,11, height 16
Res-0603 [mil]
  rect 30x35 smd: 1(-30,0) 2(30,0)
  silkscreen extent -48,-21 48,21, body extent -31,-17 31,17, height 18
RES-0603 [mil]
  rect 30x35 smd: 1(-30,0) 2(30,0)
  silkscreen extent -48,-21 48,21, body extent -31,-17 31,17, height 18
RES-0805 [mil] "SMD 0805"
  rect 40x50 smd: 1(-40,0) 2(40,0)
  silkscreen extent -64,-29 64,29, body extent -39,-25 39,24, height 24
SMA [mm]
  rect 2.5x1.7 smd: 1(-2,0) 2(2,0)
  silkscreen extent -4.44,-1.42 2.06,1.42, body extent -2.6,-1.3 2.6,1.3, height 2.4
SMB_ [mm]
  rect 2.8x2.4 smd: 1(-2.3,0) 2(2.3,0)
  silkscreen extent -2.21,-1.91 4.83,1.9, body extent -2.7,-1.8 2.7,1.8, height 2.3
SOD-323 [mm]
  rect 0.8x0.9 smd mask+0.055: 1(-1.15,0) 2(1.15,0)
  silkscreen extent -2.01,-0.79 0.94,0.79, body extent -1.3,-0.67 1.3,0.67, height 1.1
SOIC-8 [mm]
  rect 1.55x0.6 smd: 1(-2.7,1.905) 2(-2.7,0.635) 3(-2.7,-0.635) 4(-2.7,-1.905) 5(2.7,-1.905) 6(2.7,-0.635) 7(2.7,0.635) 8(2.7,1.905)
  silkscreen extent -3.76,-2.49 1.99,2.49, body extent -3,-2.45 3,2.45, height 1.7
SOT-23 [mm] "TRANS NPN 40V 0.6A SOT23"
  rect 0.82x0.92 smd: 1(-0.95,-1) 2(0.95,-1) 3(0,1)
  silkscreen extent -1.68,-1.3 1.55,0.81, body extent -1.5,-1.25 1.5,1.25, height 1.05
SOT-25-5 [mm]
  rect 1x0.7 smd: 1(-1.2,0.95) 2(-1.2,0) 3(-1.2,-0.95) 4(1.2,-0.95) 5(1.2,0.95)
  silkscreen extent -1.98,-1.55 0.76,1.55, body extent -1.19,-1.5 1.21,1.5, height 1.1
SPM0687LR5H-1 [mm]
  round 0.9 smd: 1(-1.204,1.703) 2(-1.204,-1.703) 4(1.204,-1.703) 5(1.204,1.703) 6(0,1.703)
  round 1.676 / inner round 1.676 / far side round 0 hole 1.025: 3(0,-0.913)
  silkscreen extent -2.16,-2.69 1.88,2.44, body extent -1.88,-2.68 1.88,2.38, height 1.15
TS-1185EC-C-D-B [mm]
  rect 1.25x0.9 smd: 1(-1.925,0.75) 1(1.925,0.75) 2(-1.925,-0.75) 2(1.925,-0.75)
  silkscreen extent -2.39,-1.52 1.73,1.68, body extent -2.33,-1.5 2.32,1.5, height 2
TYPE-C-31-M-12_ [mm]
  rect 0.6x1.2 smd: A1/B12(0,0) A4/B9(0.8,0) B1/A12(6.4,0) B4/A9(5.6,0)
  rect 0.3x1.2 smd: A5(1.95,0) A6(2.95,0) A7(3.45,0) A8(4.45,0) B5(4.95,0) B6(3.95,0) B7(2.45,0) B8(1.45,0)
  round 0 hole 0.62 unplated: MH(0.31,-1.07) MH(6.09,-1.07)
  oval 0.9x2 hole 0.6 slot 1.7 at 90 deg: S1(7.525,-0.57) S4(-1.125,-0.57)
  oval 0.9x1.7 hole 0.6 slot 1.4 at 90 deg: S2(7.525,-4.75) S3(-1.125,-4.75)
  silkscreen extent -1.3,-5.94 7.7,-1.93, body extent -1.27,-7.32 7.67,0.58, height 3.31
VMMC0571J150MV [mm]
  rect 3.3x1 smd: 1(-2.2,0) 2(2.2,0)
  silkscreen extent -3.86,-3.35 3.33,3.35, body extent -3.5,-3.3 3.5,3.3, height 5.7
"Voltlink Target" [mm]
  rect 0.5x1.6 smd: 1(-2.5,-1.262) 2(-1.5,-1.262) 3(-0.5,-1.262) 4(0.5,-1.262) 5(1.5,-1.262) 6(2.5,-1.262)
  rect 1.2x1.8 smd: MP1(-3.8,1.262) MP2(3.8,1.262)
  silkscreen extent -4.06,-1.68 4.06,2.17, body extent -4,-1.49 4,2.11, height 4.25
X1SON [mm] "TVS 6A@80/20µs 14V 6V 5.5V@(MAX)"
  rect 0.3x0.5 smd: 1(-0.35,0) 2(0.35,0)
  silkscreen extent -0.58,-0.33 0.58,0.47, body extent -0.5,-0.3 0.5,0.3, height 0.45
YC164-FR-0710KL [mm]
  rect 0.9x0.65 smd: 1(0,0) 4(0,-2.48) 5(1.77,-2.48) 8(1.77,0)
  rect 0.9x0.53 smd: 2(0,-0.84) 3(0,-1.64) 6(1.77,-1.64) 7(1.77,-0.84)
  silkscreen extent -0.79,-2.96 1.77,0.48, body extent 0.08,-2.84 1.69,0.36, height 0.7
YC164-JR-0733RL [mm]
  rect 0.9x0.65 smd: 1(0,0) 4(0,-2.48) 5(1.77,-2.48) 8(1.77,0)
  rect 0.9x0.53 smd: 2(0,-0.84) 3(0,-1.64) 6(1.77,-1.64) 7(1.77,-0.84)
  silkscreen extent -0.79,-2.96 1.77,0.48, body extent 0.08,-2.84 1.69,0.36, height 0.7

## Part data
C1 C35 C36 C43 C46 C47: library part CC0603KRX5R8BB105, "CAP CER 1UF 25V X5R 0603", Case Code (Imperial)=0603, Case Code (Metric)=1608, Dielectric=X5R, LCSC Part Number=C14664, Manufacturer=Yageo, Max Operating Temperature=85°C, Min Operating Temperature=-55°C, Package Quantity=1, Supplier Part Number 1=311-1445-1-ND, Tolerance=10%, Voltage Rating=25V, Capacitance=1uF, Case/Package=0603, Category="Ceramic Capacitors", ComponentLink1Description=https://datasheet.ciiva.com/176/mlccorderingcode-176785.pdf?src-supplier=Digi-Key, ComponentLink1URL=https://datasheet.ciiva.com/176/mlccorderingcode-176785.pdf?src-supplier=Digi-Key, ComponentLink2Description=https://datasheet.ciiva.com/176/mlccorderingcode-176786.pdf?src-supplier=Digi-Key, ComponentLink2URL=https://datasheet.ciiva.com/176/mlccorderingcode-176786.pdf?src-supplier=Digi-Key, ComponentLink3Description=https://datasheet.ciiva.com/176/mlccorderingcode-176787.pdf?src-supplier=Digi-Key, ComponentLink3URL=https://datasheet.ciiva.com/176/mlccorderingcode-176787.pdf?src-supplier=Digi-Key, ComponentLink4Description=https://datasheet.ciiva.com/17436/upy-gphc-x5r-4v-to-50v-12-17436952.pdf?src-supplier=Avnet+Europe, ComponentLink4URL=https://datasheet.ciiva.com/17436/upy-gphc-x5r-4v-to-50v-12-17436952.pdf?src-supplier=Avnet+Europe, ComponentLink5Description=https://datasheet.ciiva.com/7978/1525783-7978171.pdf?src-supplier=Element14, ComponentLink5URL=https://datasheet.ciiva.com/7978/1525783-7978171.pdf?src-supplier=Element14, ComponentLink6Description=https://datasheet.ciiva.com/11586/upy-gphc-x5r-4v-to-50v-12-11586318.pdf?src-supplier=Avnet, ComponentLink6URL=https://datasheet.ciiva.com/11586/upy-gphc-x5r-4v-to-50v-12-11586318.pdf?src-supplier=Avnet, Construction=Flat, Depth=0.8mm, Halogen Free="Halogen Free", Height=0.8mm, Item Type=Capacitor, Lead Free="Lead Free", Length=1.6mm, Manufacturer Part Number=CC0603KRX5R8BB105, Mount="Surface Mount", Number of Pins=2, Packaging="Tape and Reel", Pricing 1="1=0.12000, 10=0.08400, 50=0.04760, 100=0.03940, 500=0.02764, 1000=0.02288 (USD)", Radiation Hardening=No, REACH SVHC="No SVHC", RoHS=Yes, RoHS Compliant=Yes, Series=CC, Stock 1=919939, Supplier 1=Digi-Key, Termination=SMD/SMT, Thickness=0.035inch, Voltage Rating (DC)=25V, Width=0.031inch
C2: library part CC0603KRX5R7BB475, "CAP CER 4.7UF 16V X5R 0603", Case Code (Imperial)=0603, Case Code (Metric)=1608, Dielectric=X5R, LCSC Part Number=C277476, Manufacturer=Yageo, Max Operating Temperature=85°C, Min Operating Temperature=-55°C, Resistor Type=Ceramic, Supplier Part Number 1=311-1785-1-ND, Tolerance=10%, Voltage Rating=16V, Capacitance=4.7uF, Case/Package=0603, Category="Ceramic Capacitors", ComponentLink1Description=http://www.mouser.com/ds/2/447/UPY-GPHC_X5R_4V-to-50V_25-1131599.pdf?src-supplier=Mouser, ComponentLink1URL=http://www.mouser.com/ds/2/447/UPY-GPHC_X5R_4V-to-50V_25-1131599.pdf?src-supplier=Mouser, ComponentLink2Description=http://www.yageo.com/documents/recent/UPY-GPHC_X5R_4V-to-50V_25.pdf?src-supplier=Digi-Key, ComponentLink2URL=http://www.yageo.com/documents/recent/UPY-GPHC_X5R_4V-to-50V_25.pdf?src-supplier=Digi-Key, Depth=0.8mm, Halogen Free="Halogen Free", Height=0.8mm, Lead Free="Lead Free", Length=1.6mm, Manufacturer Part Number=CC0603KRX5R7BB475, Mount="Surface Mount", Packaging="Tape and Reel", Pricing 1="1=0.20000, 10=0.13800, 50=0.08280, 100=0.06990, 500=0.04784, 1000=0.04233 (USD)", RoHS=Yes, RoHS Compliant=Yes, Series=CC, Stock 1=547703, Supplier 1=Digi-Key, Termination=SMD/SMT, Thickness=0.037inch, Voltage Rating (DC)=16V, Weight=7.1E-05oz, Width=0.8mm
C3 C5 C7 C9 C11 C13 C15 C17 C48: library part CC0402KRX5R8BB105, "CAP CER 1UF 25V X5R 0402", Case Code (Imperial)=0402, Case Code (Metric)=1005, Dielectric=X5R, LCSC Part Number=C326568, Manufacturer=Yageo, Max Operating Temperature=85°C, Min Operating Temperature=-55°C, Package Quantity=10000, Supplier Part Number 1=603-CC402KRX5R8BB105, Tolerance=10%, Voltage Rating=25V, Capacitance=1uF, Case/Package=0402, Category="Ceramic Capacitors", ComponentLink1Description=http://www.mouser.com/ds/2/447/Yageo_UPY-GP_NP0_16V-to-50V_9-358835.pdf?src-supplier=Mouser, ComponentLink1URL=http://www.mouser.com/ds/2/447/Yageo_UPY-GP_NP0_16V-to-50V_9-358835.pdf?src-supplier=Mouser, ComponentLink2Description=http://www.yageo.com/documents/recent/UPY-GPHC_X5R_4V-to-50V_25.pdf?src-supplier=Digi-Key, ComponentLink2URL=http://www.yageo.com/documents/recent/UPY-GPHC_X5R_4V-to-50V_25.pdf?src-supplier=Digi-Key, ComponentLink3Description=https://4donline.ihs.com/images/VipMasterIC/IC/YAGO/YAGO-S-A0006851646/YAGO-S-A0006851646-1.pdf?hkey=6D3A4C79FDBF58556ACFDE234799DDF0&src-supplier=Newark, ComponentLink3URL=https://4donline.ihs.com/images/VipMasterIC/IC/YAGO/YAGO-S-A0006851646/YAGO-S-A0006851646-1.pdf?hkey=6D3A4C79FDBF58556ACFDE234799DDF0&src-supplier=Newark, Halogen Free="Halogen Free", Lead Free="Lead Free", Length=0.039inch, Manufacturer Part Number=CC0402KRX5R8BB105, Mount="Surface Mount", Packaging="Tape and Reel", Pricing 1="1=0.30000, 10=0.20400, 50=0.20400, 100=0.11600, 1000=0.07200, 10000=0.05900 (USD)", RoHS=Yes, RoHS Compliant=Yes, Stock 1=91975, Supplier 1=Mouser, Termination=SMD/SMT, Thickness=0.022inch, Voltage Rating (DC)=25V, Weight=2.3E-05oz, Width=0.02inch
C4 C6 C8 C10 C12 C14 C16 C18 C74: library part CC0402JRNPO9BN221, "CAP CER 220PF 50V C0G/NPO 0402", Case Code (Imperial)=0402, Case Code (Metric)=1005, Dielectric=C0G, Dielectric Material=Ceramic, Insulation Resistance=10GR, Manufacturer=Yageo, Max Operating Temperature=125°C, Min Operating Temperature=-55°C, Package Quantity=1, Supplier Part Number 1=6169284, Temperature Coefficient=30ppm/°C, Tolerance=10%, Voltage=50V, Capacitance=220pF, Case/Package=0402, Category="Ceramic Capacitors", ComponentLink1Description=https://datasheet.ciiva.com/11786/0900766b8079c870-11786154.pdf?src-supplier=RSComponents, ComponentLink1URL=https://datasheet.ciiva.com/11786/0900766b8079c870-11786154.pdf?src-supplier=RSComponents, ComponentLink2Description=https://datasheet.ciiva.com/7656/1132289-7656616.pdf?src-supplier=Element14, ComponentLink2URL=https://datasheet.ciiva.com/7656/1132289-7656616.pdf?src-supplier=Element14, ComponentLink3Description=https://datasheet.ciiva.com/8033/1443161-8033609.pdf?src-supplier=Element14, ComponentLink3URL=https://datasheet.ciiva.com/8033/1443161-8033609.pdf?src-supplier=Element14, ComponentLink4Description=https://datasheet.ciiva.com/8033/1443161-8033608.pdf?src-supplier=Element14, ComponentLink4URL=https://datasheet.ciiva.com/8033/1443161-8033608.pdf?src-supplier=Element14, ComponentLink5Description=https://datasheet.ciiva.com/176/mlccorderingcode-176384.pdf?src-supplier=Digi-Key, ComponentLink5URL=https://datasheet.ciiva.com/176/mlccorderingcode-176384.pdf?src-supplier=Digi-Key, ComponentLink6Description=https://datasheet.ciiva.com/176/mlccorderingcode-176383.pdf?src-supplier=Digi-Key, ComponentLink6URL=https://datasheet.ciiva.com/176/mlccorderingcode-176383.pdf?src-supplier=Digi-Key, ComponentLink7Description=https://datasheet.ciiva.com/176/mlccorderingcode-176385.pdf?src-supplier=Digi-Key, ComponentLink7URL=https://datasheet.ciiva.com/176/mlccorderingcode-176385.pdf?src-supplier=Digi-Key, ComponentLink8Description=https://datasheet.ciiva.com/17434/upy-gp-np0-16v-to-50v-8-17434343.pdf?src-supplier=Avnet+Europe, ComponentLink8URL=https://datasheet.ciiva.com/17434/upy-gp-np0-16v-to-50v-8-17434343.pdf?src-supplier=Avnet+Europe, Depth=0.5mm, Dissipation Factor=0.1%, Height=0.5mm, Lead Free="Lead Free", Length=1mm, Manufacturer Part Number=CC0402JRNPO9BN221, Mount="Surface Mount", Number of Pins=2, Packaging="Tape and Reel", Pricing 1="10000=0.00600, 100000=0.00600 (GBP)", Radiation Hardening=No, REACH SVHC="No SVHC", RoHS=Yes, RoHS Compliant=Yes, Series=CC, Stock 1=20000, Supplier 1=RSComponents, Termination=SMD/SMT, Thickness=0.022inch, Voltage Rating=50V, Width=0.02inch
C19 C20 C21 C22 C23 C24 C25 C26 C27 C28 C29 C30 C31 C32 C33 C34: library part CC0402KRX5R7BB104, "CAP CER 0.1UF 16V X5R 0402", Case Code (Imperial)=0402, Case Code (Metric)=1005, Dielectric=X5R, LCSC Part Number=C106204, Manufacturer=Yageo, Max Operating Temperature=85°C, Min Operating Temperature=-55°C, Package Quantity=1, Resistor Type=Ceramic, Supplier Part Number 1=603-CC402KRX5R7BB104, Tolerance=10%, Voltage Rating=16V, Capacitance=100nF, Case/Package=0402, Category="Ceramic Capacitors", ComponentLink1Description=https://datasheet.ciiva.com/155/mlccorderingcode-155879.pdf?src-supplier=Digi-Key, ComponentLink1URL=https://datasheet.ciiva.com/155/mlccorderingcode-155879.pdf?src-supplier=Digi-Key, ComponentLink2Description=https://datasheet.ciiva.com/155/mlccorderingcode-155878.pdf?src-supplier=Digi-Key, ComponentLink2URL=https://datasheet.ciiva.com/155/mlccorderingcode-155878.pdf?src-supplier=Digi-Key, ComponentLink3Description=https://datasheet.ciiva.com/155/mlccorderingcode-155880.pdf?src-supplier=Digi-Key, ComponentLink3URL=https://datasheet.ciiva.com/155/mlccorderingcode-155880.pdf?src-supplier=Digi-Key, ComponentLink4Description=https://datasheet.ciiva.com/11464/upy-gphc-x5r-4v-to-50v-12-11464869.pdf?src-supplier=Avnet, ComponentLink4URL=https://datasheet.ciiva.com/11464/upy-gphc-x5r-4v-to-50v-12-11464869.pdf?src-supplier=Avnet, Construction=Flat, Depth=0.5mm, Halogen Free="Halogen Free", Height=0.5mm, Lead Free="Lead Free", Length=1mm, Manufacturer Part Number=CC0402KRX5R7BB104, Mount="Surface Mount", Number of Pins=2, Packaging="Tape and Reel", Pricing 1="1=0.10000, 10=0.02300, 50=0.02300, 100=0.01100, 1000=0.00600, 10000=0.00400 (USD)", Radiation Hardening=No, REACH SVHC=Unknown, RoHS=Yes, RoHS Compliant=Yes, Series=CC, Stock 1=936792, Supplier 1=Mouser, Termination=SMD/SMT, Thickness=0.022inch, Voltage Rating (DC)=16V, Width=0.02inch
C37 C38 C41 C44 C45 C53: library part CC0603KRX5R9BB104, "CAP CER 0.1UF 50V X5R 0603", Case Code (Imperial)=0603, Case Code (Metric)=1608, Dielectric=X5R, LCSC Part Number=C110022, Manufacturer=Yageo, Max Operating Temperature=85°C, Min Operating Temperature=-55°C, Package Quantity=4000, Supplier Part Number 1=311-4046-1-ND, Tolerance=10%, Voltage Rating=50V, Capacitance=100nF, Case/Package=0603, Category="Ceramic Capacitors", ComponentLink1Description=http://www.mouser.com/ds/2/447/Yageo_UPY-GP_NP0_16V-to-50V_9-358835.pdf?src-supplier=Mouser, ComponentLink1URL=http://www.mouser.com/ds/2/447/Yageo_UPY-GP_NP0_16V-to-50V_9-358835.pdf?src-supplier=Mouser, ComponentLink2Description=https://www.yageo.com/upload/media/product/productsearch/datasheet/mlcc/UPY-GPHC_X5R_4V-to-50V_26.pdf?src-supplier=Digi-Key, ComponentLink2URL=https://www.yageo.com/upload/media/product/productsearch/datasheet/mlcc/UPY-GPHC_X5R_4V-to-50V_26.pdf?src-supplier=Digi-Key, ComponentLink3Description=http://www.yageo.com/exep/pages/download/literatures/ProductSelectionGuide%202014_Final_2.pdf?src-supplier=Digi-Key, ComponentLink3URL=http://www.yageo.com/exep/pages/download/literatures/ProductSelectionGuide%202014_Final_2.pdf?src-supplier=Digi-Key, Halogen Free="Halogen Free", Item Type=Capacitor, Lead Free="Lead Free", Length=0.063inch, Manufacturer Part Number=CC0603KRX5R9BB104, Mount="Surface Mount", Packaging="Tape and Reel", Pricing 1="1=0.10000, 10=0.05200, 50=0.02820, 100=0.02310, 500=0.01648, 1000=0.01294 (USD)", RoHS=Yes, Stock 1=152253, Supplier 1=Digi-Key, Termination=SMD/SMT, Thickness=0.035inch, Voltage Rating (DC)=50V, Weight=7.1E-05oz, Width=0.031inch
C39 C40: library part CC0603JRNPO9BN200, "CAP CER 20PF 50V C0G/NPO 0603", Case Code (Imperial)=0603, Case Code (Metric)=1608, Dielectric=C0G, LCSC Part Number=C105621, Manufacturer=Yageo, Max Operating Temperature=125°C, Min Operating Temperature=-55°C, Package Quantity=4000, Supplier Part Number 1=311-1424-6-ND, Tolerance=5%, Voltage Rating=50V, Capacitance=20pF, Case/Package=0603, ComponentLink1Description=http://www.farnell.com/datasheets/1132289.pdf?src-supplier=Element14, ComponentLink1URL=http://www.farnell.com/datasheets/1132289.pdf?src-supplier=Element14, ComponentLink2Description=http://www.yageo.com/documents/recent/UPY-GP_NP0_16V-to-50V_16.pdf?src-supplier=Digi-Key, ComponentLink2URL=http://www.yageo.com/documents/recent/UPY-GP_NP0_16V-to-50V_16.pdf?src-supplier=Digi-Key, Composition=Ceramic, Depth=0.8mm, Item Type=Capacitor, Lead Free="Lead Free", Length=1.6mm, Manufacturer Part Number=CC0603JRNPO9BN200, Mount="Surface Mount", Number of Pins=2, Packaging="Tape and Reel", Pricing 1="1=0.1, 10=0.048, 100=0.0214, 500=0.01526, 1000=0.01198 (USD)", REACH SVHC=Unknown, Stock 1=259568, Supplier 1=Digi-Key, Termination=SMD/SMT, Thickness=0.035inch, Voltage Rating (DC)=50V, Weight=7.1E-05oz, Width=0.8mm
C42: library part 08051C224K4T2A, "CAP CER 0.22UF 100V X7R 0805", Case/Package=0805, Dielectric=X7R, LCSC Part Number=C2176107, Manufacturer="Kyocera AVX", Max Operating Temperature=125°C, Min Operating Temperature=-55°C, Supplier Part Number 1=478-13049-1-ND, Tolerance=10%, Voltage Rating (DC)=100V, Capacitance=220nF, Category="Ceramic Capacitors", ComponentLink1Description=http://datasheets.avx.com/AutoMLCC.pdf?src-supplier=Avnet+Asia, ComponentLink1URL=http://datasheets.avx.com/AutoMLCC.pdf?src-supplier=Avnet+Asia, Contact Plating=Tin, Item Type=Capacitor, Length=2.01mm, Manufacturer Part Number=08051C224K4T2A, Mount="Surface Mount", Pricing 1="1=0.27000, 10=0.18500, 50=0.12320, 100=0.10470, 500=0.07392, 1000=0.06468 (USD)", RoHS=Yes, RoHS Compliant=Yes, Stock 1=151, Supplier 1=Digi-Key, Termination=Wraparound
C49 C50 C63: library part CC0402KRX5R7BB223, "CAP CER 0.022UF 16V X5R 0402", Case Code (Imperial)=0402, Case Code (Metric)=1005, Dielectric=X5R, LCSC Part Number=C541399, Manufacturer=Yageo, Max Operating Temperature=85°C, Min Operating Temperature=-55°C, Supplier Part Number 1=603-CC402KRX5R7BB223, Tolerance=10%, Voltage Rating=16V, Capacitance=22nF, Case/Package=0402, Category="Ceramic Capacitors", ComponentLink1Description=http://www.yageo.com/exep/pages/download/literatures/ProductSelectionGuide%202014_Final_2.pdf?src-supplier=Digi-Key, ComponentLink1URL=http://www.yageo.com/exep/pages/download/literatures/ProductSelectionGuide%202014_Final_2.pdf?src-supplier=Digi-Key, ComponentLink2Description=http://www.yageo.com/documents/recent/UPY-GPHC_X5R_4V-to-50V_25.pdf?src-supplier=Digi-Key, ComponentLink2URL=http://www.yageo.com/documents/recent/UPY-GPHC_X5R_4V-to-50V_25.pdf?src-supplier=Digi-Key, Halogen Free="Halogen Free", Lead Free="Lead Free", Length=0.039inch, Manufacturer Part Number=CC0402KRX5R7BB223, Mount="Surface Mount", Packaging="Tape and Reel", Pricing 1="1=0.10000, 10=0.05600, 50=0.05600, 100=0.02500, 1000=0.01400, 10000=0.01000 (USD)", RoHS=Yes, RoHS Compliant=Yes, Stock 1=31160, Supplier 1=Mouser, Thickness=0.022inch, Voltage Rating (DC)=16V, Width=0.02inch
C51: library part C1608X5R1E106M080AC, "CAP CER 10UF 25V X5R 0603", Case Code (Imperial)=0603, Case Code (Metric)=1608, Dielectric=X5R, Dielectric Material=Ceramic, LCSC Part Number=C2168289, Manufacturer=TDK, Max Operating Temperature=85°C, Min Operating Temperature=-55°C, Package Quantity=1, Supplier Part Number 1=445-9015-1-ND, Tolerance=20%, Voltage Rating=25V, Capacitance=10uF, Case/Package=0603, Composition=Ceramic, Depth=0.8mm, Height=0.8mm, Lead Free="Lead Free", Length=1.6mm, Manufacturer Part Number=C1608X5R1E106M080AC, Mount="Surface Mount", Packaging="Tape and Reel", Pricing 1="1=0.96, 10=0.704, 100=0.483, 500=0.38238, 1000=0.322 (USD)", REACH SVHC="No SVHC", Stock 1=61681, Supplier 1=Digi-Key, Termination=SMD/SMT, Thickness=0.039inch, Voltage Rating (DC)=25V, Weight=7.1E-05oz, Width=0.8mm
C52 C54 C55 C56 C57 C58 C59 C60 C69 C71: library part GRM155R62A104KE14D, "CAP CER 0.1UF 100V X5R 0402", Capacitance=100nF, Case Code (Imperial)=0402, Case Code (Metric)=1005, Dielectric=X5R, LCSC Part Number=C162178, Manufacturer=Murata, Max Operating Temperature=85°C, Min Operating Temperature=-55°C, Package Quantity=10000, Tolerance=10%, Voltage Rating=100V, Case/Package=0402, Category="Ceramic Capacitors", ComponentLink1Description=http://www.farnell.com/datasheets/2079151.pdf?src-supplier=Farnell, ComponentLink1URL=http://www.farnell.com/datasheets/2079151.pdf?src-supplier=Farnell, ComponentLink2Description=http://www.mouser.com/ds/2/281/c02e-2905.pdf?src-supplier=Mouser, ComponentLink2URL=http://www.mouser.com/ds/2/281/c02e-2905.pdf?src-supplier=Mouser, ComponentLink3Description=http://www.farnell.com/datasheets/2079151.pdf?src-supplier=Element14, ComponentLink3URL=http://www.farnell.com/datasheets/2079151.pdf?src-supplier=Element14, ComponentLink4Description=http://search.murata.co.jp/Ceramy/image/img/A01X/G101/ENG/GRM155R62A104KE14-01.pdf?src-supplier=Digi-Key, ComponentLink4URL=http://search.murata.co.jp/Ceramy/image/img/A01X/G101/ENG/GRM155R62A104KE14-01.pdf?src-supplier=Digi-Key, ComponentLink5Description=http://www.farnell.com/datasheets/2079151.pdf?src-supplier=Newark, ComponentLink5URL=http://www.farnell.com/datasheets/2079151.pdf?src-supplier=Newark, Height=0.5mm, Item Type=Capacitor, Lead Free="Lead Free", Length=0.039inch, Manufacturer Part Number=GRM155R62A104KE14D, Mount="Surface Mount", Packaging="Tape and Reel", Pricing 1="10000=0.00500, 20000=0.00410, 30000=0.00390, 50000=0.00370, 100000=0.00300 (USD)", Reach SVHC Compliant=Yes, RoHS=Yes, RoHS Compliant=Yes, Series=GRM, Stock 1=870000, Supplier 1="Arrow Electronics", Supplier Part Number 1=GRM155R62A104KE14D, Termination=SMD/SMT, Thickness=0.022inch, Voltage Rating (DC)=100V, Weight=0.000212oz, Width=0.02inch
C61 C62: library part 0603B682K500NT, "50V 6.8nF X7R ±10% 0603", LCSC Part Number=C1631, Manufacturer=FH, ComponentLink1Description=LCSC, ComponentLink1URL=https://www.lcsc.com/product-detail/Multilayer-Ceramic-Capacitors-MLCC-SMD-SMT_FH-Guangdong-Fenghua-Advanced-Tech-0603B682K500NT_C1631.html, Item Type=Capacitor, Manufacturer Part Number=0603B682K500NT
C64 C65: library part AC0603KRX7R0BB103, "CAP CER 10000PF 100V X7R 0603", Case Code (Imperial)=0603, Case Code (Metric)=1608, LCSC Part Number=C149602, Manufacturer=Yageo, Max Operating Temperature=125°C, Min Operating Temperature=-55°C, Ratings=AEC-Q200, Supplier Part Number 1=1985307, Tolerance=10%, Voltage Rating=100V, Capacitance=10nF, Case/Package=0603, Category="Ceramic Capacitors", ComponentLink1Description=http://www.yageo.com/NewPortal/_en/search/productDocs.jsp?YageoPartNumber=AC0603KRX7R0BB103&src-supplier=Digi-Key, ComponentLink1URL=http://www.yageo.com/NewPortal/_en/search/productDocs.jsp?YageoPartNumber=AC0603KRX7R0BB103&src-supplier=Digi-Key, ComponentLink2Description=https://www.yageo.com/upload/media/product/productsearch/datasheet/mlcc/UPY-AC_NP0X7R_16V-to-630V_12.pdf?src-supplier=Digi-Key, ComponentLink2URL=https://www.yageo.com/upload/media/product/productsearch/datasheet/mlcc/UPY-AC_NP0X7R_16V-to-630V_12.pdf?src-supplier=Digi-Key, Item Type=Capacitor, Lead Free="Lead Free", Manufacturer Part Number=AC0603KRX7R0BB103, Mount="Surface Mount", Packaging="Tape and Reel", Pricing 1="250=0.02700, 1000=0.02500, 2000=0.02100 (GBP)", RoHS=Yes, RoHS Compliant=Yes, Stock 1=750, Supplier 1=RSComponents
C66: library part C1608X5R1E475KT000E, "CAP CER, 4.7 µF, 25 V, 0603", Case Code (Imperial)=0603, Case Code (Metric)=1608, Dielectric=X5R, Dielectric Material=Ceramic, LCSC Part Number=C76615, Manufacturer=TDK, Max Operating Temperature=85°C, Min Operating Temperature=-55°C, Package Quantity=4000, Supplier Part Number 1=2220Y1000562GCT-ND, Tolerance=10%, Voltage Rating=25V, Capacitance=4.7uF, Case/Package=0603, Category="Ceramic Capacitors", ComponentLink1Description=https://datasheet.ciiva.com/48587/6print-detail-pdf-phplangenpart-noc1608x5r1e475k080acimp-unit-xmhz-48587141.pdf?src-supplier=Onlinecomponents.com, ComponentLink1URL=https://datasheet.ciiva.com/48587/6print-detail-pdf-phplangenpart-noc1608x5r1e475k080acimp-unit-xmhz-48587141.pdf?src-supplier=Onlinecomponents.com, ComponentLink2Description=https://datasheet.ciiva.com/24216/mlcc-commercial-general-en-24216326.pdf?src-supplier=Mouser, ComponentLink2URL=https://datasheet.ciiva.com/24216/mlcc-commercial-general-en-24216326.pdf?src-supplier=Mouser, ComponentLink3Description=https://datasheet.ciiva.com/48671/mlcc-commercial-general-en-48671304.pdf?src-supplier=Avnet, ComponentLink3URL=https://datasheet.ciiva.com/48671/mlcc-commercial-general-en-48671304.pdf?src-supplier=Avnet, Depth=0.8mm, Height=0.8mm, Lead Free="Lead Free", Length=1.6mm, Manufacturer Part Number=C1608X5R1E475KT000E, Mount="Surface Mount", Packaging="Tape and Reel", Pricing 2="100=0.23400, 200=0.21900, 1000=0.20700, 2000=0.18700 (GBP)", REACH SVHC="No SVHC", Resistor Type=Ceramic, RoHS=No, Stock 2=16120, Supplier 1=Digi-Key, Supplier 2=RSComponents, Supplier Part Number 2=9159158P, Termination=SMD/SMT, Thickness=0.039inch, Voltage Rating (DC)=25V, Weight=7.1E-05oz, Width=0.031inch